# Altium PCB AI_Watch_PCB.PcbDoc (part 3 of 3)
Units mm, origin at the board's own origin, x right, y up, seen from the top; angles counter-clockwise.
Board outline 25 x 31 mm, 4 copper layers (Top Layer, Ground, Power, Bottom Layer), stack 1.586 mm thick; 87 components, 63 nets, 302 pads, 164 vias.
Unrouted connection lines stored in the file: 13.
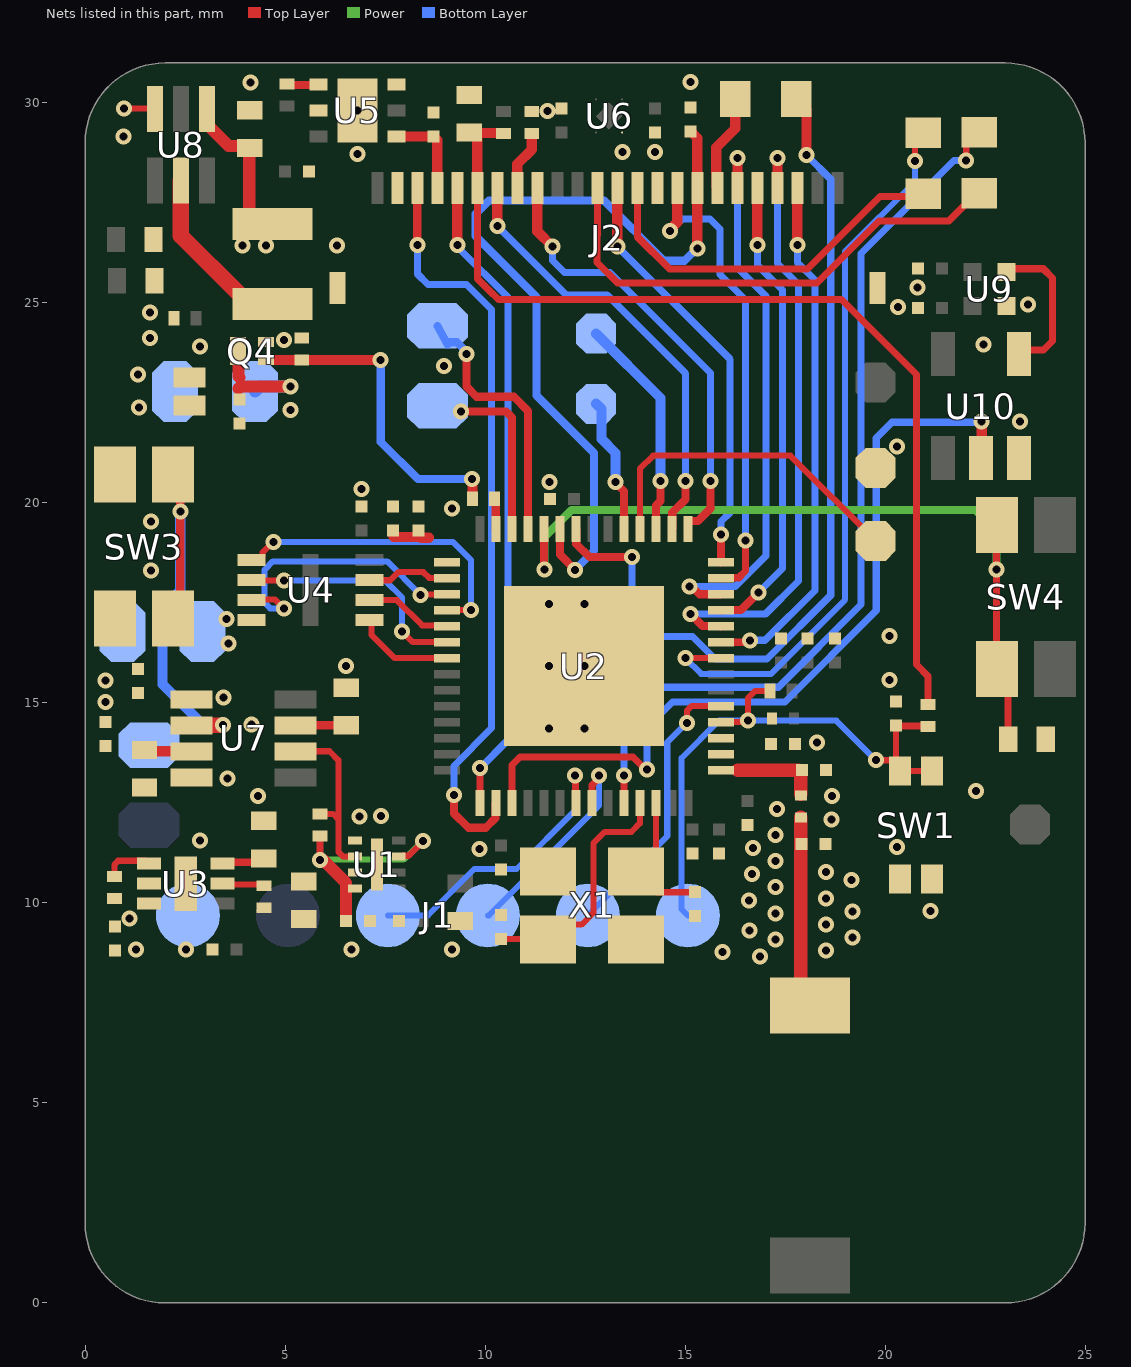
[diagram p4: the nets of this part, all layers, seen from the top]

## Via types
v1: diameter 0.4, hole 0.2, Top Layer to Bottom Layer, tented both sides, 146 vias
v2: diameter 0.4, hole 0.2, Top Layer to Bottom Layer, 18 vias

## Nets (pads, with @x,y where several pads share a name; then routed paths per layer and width w, separated by ;. In a path a pad name is that pad's centre, name@x,y a point inside that pad or via, vN(x,y) a via of type N, cw(c..) or ccw(c..) an arc to the next point about the centre after c; other vN are vias at no path point) (continued)
CSI_2V8: C32.2 J2.21 U5.1 | length 2.2
  Top Layer w0.254: U5.1@7.784,29.156 U5.1@7.784,29.156 8.711,29.158 C32.2@8.712,29.159 8.806,29.066 J2.21@8.806,27.879
CSI_D0: J2.6 U2.12 | length 14.1
  Top Layer w0.178: J2.6@16.306,27.879 J2.6@16.308,27.881 ; v1@16.308,28.623 v1(16.311,28.626)
  Top Layer w0.203: v1(15.111,17.91) 15.165,17.91 15.356,17.719 U2.12@15.896,17.719 U2.12@15.905,17.711
  Top Layer w0.254: J2.6@16.308,27.881 v1@16.308,28.623
  Bottom Layer w0.178: v1(15.111,17.91) 16.253,17.91 17.023,18.68 17.023,25.167 16.311,25.879 v1(16.311,28.626)
CSI_D1: J2.4 U2.10 | length 15.5
  Top Layer w0.178: v1@17.308,28.623 v1(17.311,28.626)
  Top Layer w0.203: v1(15.141,17.22) 15.439,16.922 15.894,16.922 U2.10@15.896,16.919
  Top Layer w0.254: J2.4@17.308,27.881 v1@17.308,28.623
  Bottom Layer w0.178: v1(15.141,17.22) 17.005,17.22 17.836,18.05 17.836,25.464 17.311,25.989 v1(17.311,28.626)
CSI_D2: J2.3 U2.9 | length 13.1
  Top Layer w0.178: U2.9@15.896,16.519 16.516,16.519 16.564,16.567 v1(16.624,16.567)
  Top Layer w0.254: v1(17.806,26.448) J2.3@17.806,27.879
  Bottom Layer w0.178: v1(16.624,16.567) 17.001,16.567 18.246,17.812 18.246,25.574 17.806,26.014 v1(17.806,26.448)
CSI_D3: J2.5 U2.11 | length 11.7
  Top Layer w0.203: U2.11@15.896,17.319 15.905,17.327 16.4,17.327 v1(16.837,17.764)
  Top Layer w0.254: v1(16.806,26.448) J2.5@16.806,27.879
  Bottom Layer w0.178: v1(16.806,26.448) 16.806,25.952 17.435,25.323 17.435,18.362 v1(16.837,17.764)
CSI_D4: J2.7 R15.1 | length 2.4
  Top Layer w0.254: J2.7@15.806,27.879 15.783,27.902 15.783,28.272 15.781,28.274 15.781,28.885 16.256,29.36 R15.1@16.256,30.098
CSI_D4#: R15.2 U2.22 | length 22.2
  Top Layer w0.203: U2.22@12.271,19.344 12.28,19.336 12.28,18.977 12.611,18.646 v1(13.671,18.646)
  Top Layer w0.254: R15.2@17.78,30.098 18.033,29.846 v1(18.033,28.702)
  Bottom Layer w0.178: v1(13.671,18.646) 13.671,17.16 14.174,16.657 15.189,16.657 15.746,16.101 17.05,16.101 18.641,17.692 18.641,28.093 v1(18.033,28.702)
CSI_D5: J2.9 U2.13 | length 12.1
  Top Layer w0.178: U2.13@15.896,18.119 15.909,18.131 16.341,18.131 16.511,18.302 v1(16.509,19.061) v1(16.509,19.061)
  Top Layer w0.254: v1(14.628,26.797) 14.628,26.837 14.806,27.014 J2.9@14.806,27.879
  Bottom Layer w0.178: v1(14.628,26.797) 14.933,27.102 15.622,27.102 15.876,26.847 15.876,25.709 16.509,25.076 v1(16.509,19.061)
CSI_D6: J2.11 R14.1 | length 9.6
  Top Layer w0.178: J2.11@13.806,27.879 13.806,26.656 14.615,25.847 18.058,25.847 19.873,27.661 R14.1@21.104,27.661
CSI_D6#: R14.2 U2.8 | length 18.4
  Top Layer w0.152: v1(15.008,16.119) U2.8@15.896,16.119 ; v1(20.747,28.554) 20.747,28.949 21.003,29.205 R14.2@21.055,29.205 ; R14.2@21.118,29.369 R14.2@21.18,29.431
  Bottom Layer w0.152: v1(15.008,16.119) 15.399,15.728 17.149,15.728 19.003,17.582 19.003,26.291 20.747,28.035 v1(20.747,28.554)
CSI_D7: J2.13 R16.2 | length 12.5
  Top Layer w0.178: J2.13@12.806,27.879 12.806,26.693 12.802,26.689 12.802,26.014 13.318,25.498 18.3,25.498 19.851,27.049 21.592,27.049 22.199,27.657 R16.2@22.199,27.745
CSI_D7#: R16.1 U2.52 | length 22.7
  Top Layer w0.152: v1(22.028,28.56) 22.028,28.965 22.119,29.055 R16.1@22.416,29.055 ; R16.1@22.199,29.269 22.212,29.283 R16.1@22.508,29.283
  Top Layer w0.178: U2.52@13.471,12.494 v1(13.471,13.183)
  Bottom Layer w0.178: v1(13.471,13.183) 13.471,14.563 14.302,15.393 17.333,15.393 19.398,17.458 19.398,26.237 21.721,28.56 v1(22.028,28.56)
CSI_HSYNC: J2.16 U2.15 | length 11.4
  Top Layer w0.203: U2.15@15.071,19.344 15.071,19.544 15.08,19.552 15.323,19.552 15.635,19.864 v1(15.635,20.551)
  Top Layer w0.254: J2.16@11.306,27.879 11.306,26.794 v1(11.687,26.413)
  Bottom Layer w0.178: v1(11.687,26.413) 11.687,26.058 11.982,25.763 13.125,25.763 15.637,23.25 15.637,20.553 v1(15.635,20.551)
CSI_MCLK: J2.12 U2.14 | length 10.6
  Top Layer w0.203: U2.14@15.896,18.519 v1(15.896,19.206)
  Top Layer w0.254: v1(13.306,26.413) J2.12@13.306,27.879
  Bottom Layer w0.178: v1(13.306,26.413) 16.127,23.591 16.127,19.766 15.896,19.536 v1(15.896,19.206)
CSI_PCLK: C34.1 J2.8 U2.23 | length 20.9
  Top Layer w0.203: U2.23@11.871,19.344 11.871,18.708 v1(12.25,18.329)
  Top Layer w0.254: C34.1@15.138,29.29 15.306,29.123 J2.8@15.306,27.879 v1(15.306,26.365)
  Bottom Layer w0.203: v1(12.25,18.329) 12.726,18.805 12.726,21.247 11.283,22.69 11.283,25.15 9.761,26.672 9.761,27.224 10.095,27.558 12.978,27.558 14.48,26.056 14.99,26.056 15.299,26.365 v1(15.306,26.365)
CSI_RST: C26.2 J2.19 R4.1 R8.2 | length 24.9
  Top Layer w0.178: C26.2@9.601,29.261 9.613,29.249 9.678,29.249 C26.2@9.806,29.121 ; J2.19@9.806,27.879 9.806,25.609 10.192,25.223 10.198,25.223 10.333,25.088 18.906,25.088 20.785,23.209 20.785,15.96 21.076,15.67 R8.2@21.076,14.961 ; R4.1@10.452,29.249 R4.1@10.464,29.237
  Top Layer w0.254: C26.2@9.678,29.249 R4.1@10.452,29.249 ; J2.19@9.806,27.879 C26.2@9.806,29.121
CSI_VSYNC: J2.18 U2.16 | length 11.2
  Top Layer w0.203: U2.16@14.671,19.344 14.68,19.352 14.68,19.763 15.008,20.091 v1(15.008,20.551)
  Top Layer w0.254: v1(10.306,26.921) J2.18@10.306,27.879
  Bottom Layer w0.178: v1(10.306,26.921) 12.029,25.197 13.052,25.197 15.008,23.241 v1(15.008,20.551)
DIN#: U9.4 U10.4 | length 3.8
  Top Layer w0.178: U9.4@23.031,25.855 23.953,25.855 24.187,25.621 24.187,24.049 23.963,23.825 U10.4@23.343,23.825
EN: C22.1 J1.6 R5.1 R8.1 SW1.2 SW1.4 U2.4 | length 14.9
  Top Layer w0.152: U2.4@15.896,14.519 16.533,14.519 v1(16.571,14.557) 16.571,15.121 16.751,15.3 R5.1@17.119,15.3 ; v1(19.769,13.569) 20.089,13.569 ; C22.1@20.282,14.424 20.269,14.411 20.269,13.405 SW1.2@20.377,13.297 SW1.4@21.177,13.297
  Top Layer w0.178: C22.1@20.282,14.424 R8.1@20.98,14.424 ; SW1.4@20.991,13.569 21.177,13.382 SW1.4@21.177,13.297
  Bottom Layer w0.152: J1.6@15.069,9.687 14.911,9.845 14.911,13.621 15.847,14.557 v1(16.571,14.557) 18.781,14.557 v1(19.769,13.569)
EN_3V3: R9.2 U1.6 U7.6 | length 4.5
  Top Layer w0.152: U7.6@5.264,13.793 6.11,13.793 6.334,13.569 6.334,12.104 6.334,11.278 6.454,11.158 U1.6@6.746,11.158 ; R9.2@5.796,12.224 6.198,12.224 6.318,12.104
ESP_USB_D+: TP2.1 U2.26 | length 4.1
  Top Layer w0.203: v1(9.395,22.289) 10.523,22.289 10.671,22.14 U2.26@10.671,19.344
ESP_USB_D-: TP2.2 U2.25 | length 6.8
  Top Layer w0.203: v1(9.538,23.728) 9.538,22.907 9.79,22.656 10.721,22.656 11.074,22.303 U2.25@11.074,19.344
  Bottom Layer w0.203: TP2.2@8.81,24.428 9.06,23.958 9.118,24.016 9.302,24.016 9.538,23.781 v1(9.538,23.728)
GATE_MOT: Q4.1 R6.2 R20.2 | length 8
  Top Layer w0.254: Q4.1@4.521,23.571 R20.2@5.416,23.571 v1(7.391,23.571) ; R6.2@9.682,20.206 v1@9.682,20.599
  Bottom Layer w0.203: v1(7.391,23.571) 7.391,21.527 8.319,20.599 v1(9.677,20.599)
GND: C1.1 C2.1 C3.1 C4.1 C5.1 C6.1 C7.1 C8.1 C9.1 C10.2 C11.1 C12.1 C13.1 C14.1 C15.1 C16.1 C17.1 C18.1 C19.1 C20.1 C21.1 C22.2 C23.1 C24.1 C25.2 C26.1 C27.1 C28.1 C29.1 C30.1 C31.1 C32.1 C33.1 C34.2 C35.2 C45.1 C46.2 C47.1 J1.1 J2.10 J2.23 J2.MP1 J2.MP2 Q4.2 R1.1 R3.2 R12.1 R19.2 R20.1 RT1.1 SW1.1 SW1.3 SW3.2 TP1.1 TP3.1 TP6.1 U1.5 U1.9 U2.57 U3.5 U3.7 U4.4 U5.3 U5.5 U5.7 U6.2 U7.4 U8.3 U9.3 U10.3 X1.2 X1.4 | length 0.9
  Top Layer w0.152: v1(0.974,29.861) 1.619,29.861 1.721,29.759 U8.3@1.721,29.671
  other v1: 15.934,8.779 1.27,8.839 2.518,8.839 6.655,8.839 9.169,8.839 21.133,9.804 9.855,11.353 20.295,11.405 2.87,11.557 18.661,12.091 6.858,12.167 7.398,12.169 4.318,12.675 18.669,12.675 22.276,12.802 3.556,13.106 18.299,14.014 11.594,14.362 12.483,14.362 20.113,15.57 6.528,15.926 11.594,15.921 12.483,15.921 3.581,16.485 20.113,16.671 3.541,17.098 11.594,17.48 12.483,17.48 1.651,18.313 1.651,19.533 9.169,19.863 6.909,20.345 11.608,20.527 20.293,21.412 23.375,22.042 8.97,23.426 2.873,23.909 22.455,23.967 4.973,24.076 1.626,24.13 1.626,24.765 20.32,24.905 23.57,24.965 20.814,25.389 6.299,26.441 6.809,28.727 13.437,28.778 14.249,28.778 0.965,29.159 6.809,29.806 11.557,29.794 4.14,30.505 15.138,30.522
  other v2: 16.875,8.663 18.522,8.809 17.26,9.085 19.182,9.136 16.616,9.312 18.522,9.463 17.26,9.739 19.182,9.79 16.6,10.066 18.522,10.117 17.26,10.393 19.16,10.57 16.676,10.72 18.522,10.771 17.26,11.047 16.702,11.374 17.26,11.701 17.302,12.354
GPIO0: J1.5 U2.5 | length 7
  Top Layer w0.152: v1@15.037,14.503 15.045,14.511 15.045,14.806 15.158,14.919 U2.5@15.896,14.919
  Bottom Layer w0.152: J1.5@12.569,9.687 14.554,11.672 14.554,14.012 v1(15.046,14.503)
HAPTIC_MOT: R6.1 U2.27 | length 0.8
  Top Layer w0.203: U2.27@10.268,19.344 R6.1@10.268,20.105
IMG_CAPTURE: R19.1 SW4.1 U2.24 | length 20.1
  Top Layer w0.152: v1@11.471,18.352 v1(11.481,18.342) ; v1@11.532,18.393 v1@11.582,18.342
  Top Layer w0.178: SW4.1@22.795,19.453 22.784,19.441 v1(22.784,18.339) 22.784,15.865 SW4.1@22.795,15.853 23.076,15.573 R19.1@23.076,14.097
  Top Layer w0.203: v1@11.471,18.352 U2.24@11.471,19.344
  Power w0.203: v1(11.481,18.342) 11.481,19.147 12.162,19.828 22.26,19.828 22.784,19.304 v1(22.784,18.339)
IO38/SCL: J2.20 U2.43 | length 16.1
  Top Layer w0.178: U2.43@9.871,12.494 v1(9.871,13.369)
  Top Layer w0.254: v1(9.306,26.452) J2.20@9.306,27.879
  Bottom Layer w0.178: v1@9.337,26.377 10.568,25.145 10.568,14.066 v1(9.871,13.369)
IO39/SDA: J2.22 U2.44 | length 19.1
  Top Layer w0.203: v1(8.306,26.452) J2.22@8.306,27.879 ; v1(9.22,12.7) 9.225,12.695 9.225,12.24 9.584,11.881 10.017,11.881 10.263,12.127 10.263,12.486 U2.44@10.271,12.494
  Bottom Layer w0.178: v1@8.241,26.452 v1(8.306,26.452) 8.306,25.73 8.574,25.462 9.537,25.462 10.164,24.835 10.164,14.371 9.22,13.427 v1(9.22,12.7)
LNA_IN: C19.2 L2.2 U2.1 | length 2.2
  Top Layer w0.33: 16.313,13.319 17.845,13.319 17.891,13.273 L2.2@17.891,12.713
NetANT1_1: ANT1.1 C18.2 L2.1 | length 4.9
  Top Layer w0.33: L2.1@17.891,12.15 17.891,7.836 ANT1.1@18.313,7.415
NetC28_2: C28.2 U7.3 | length 1.2
  Top Layer w0.254: C28.2@1.484,13.75 1.527,13.793 U7.3@2.664,13.793
NetC29_2: C29.2 U7.7 | length 1.3
  Top Layer w0.203: U7.7@5.264,14.443 C29.2@6.528,14.443
NetC48_1: C48.1 D1.1 Q4.3 TP5.1 | length 2.9
  Top Layer w0.305: Q4.3@3.827,23.803 3.839,23.791 3.839,23.16 3.857,23.142 ; 3.835,22.86 3.889,22.914 v1(5.131,22.914)
  Bottom Layer w0.305: TP5.1@4.247,22.785 4.377,22.914 v1@5.127,22.914
  other v1: 5.131,22.327
NetL4_2: L4.2 U8.5 | length 4.3
  Top Layer w0.406: U8.5@2.393,28.067 2.393,26.683 3.887,25.189 3.887,25.176 3.906,25.157 L4.2@4.684,25.157
NetR1_2: R1.2 U3.2 | length 1.1
  Top Layer w0.152: U3.2@3.435,10.482 3.453,10.464 4.434,10.464 R1.2@4.469,10.43
NetR13_1: R13.1 U5.4 | length 0.8
  Top Layer w0.203: R13.1@5.048,30.475 5.07,30.453 5.838,30.453 U5.4@5.86,30.431
NetRT1_2: RT1.2 U3.3 | length 1.1
  Top Layer w0.178: U3.3@3.435,10.982 3.471,11.018 4.376,11.018 RT1.2@4.47,11.112
NetTP9_1: TP9.1 U2.19 | length 3.4
  Top Layer w0.203: v1(13.261,20.523) 13.261,20.502 13.471,20.292 U2.19@13.471,19.344
  Bottom Layer w0.254: TP9.1@12.776,22.479 12.914,22.341 12.914,21.598 13.261,21.251 v1(13.261,20.523)
NetTP10_1: TP10.1 U2.18 | length 8.4
  Top Layer w0.152: U2.18@13.871,19.344 13.871,20.856 14.199,21.184 17.633,21.184 TP10.1@19.766,19.05
NetTP11_1: TP11.1 U2.17 | length 5.6
  Top Layer w0.203: U2.17@14.271,19.344 14.271,19.935 14.384,20.047 v1(14.384,20.551)
  Bottom Layer w0.254: TP11.1@12.776,24.232 14.384,22.624 v1(14.384,20.551)
P_BUTTON: SW3.1 U7.2 | length 10.9
  Top Layer w0.203: SW3.1@2.212,20.876 2.379,20.709 2.379,17.114 SW3.1@2.373,17.107
  Top Layer w0.381: U7.2@2.777,14.443 2.78,14.445 3.448,14.445 v1(3.451,14.448)
  Bottom Layer w0.254: v1@2.379,19.767 2.379,17.802 1.939,17.361 1.939,15.462 2.953,14.448 v1(3.451,14.448)
  other v1: 2.379,19.782
PWDN: J2.17 R3.1 | length 1.5
  Top Layer w0.254: J2.17@10.806,27.879 10.806,28.472 11.167,28.833 R3.1@11.167,29.237
RGB_LED: U2.45 U10.2 | length 20.2
  Top Layer w0.178: U2.45@10.671,12.764 10.671,13.452 10.869,13.649 13.701,13.649 14.013,13.337 v1(14.048,13.337)
  Top Layer w0.254: U10.2@22.415,21.248 v1(22.415,22.042)
  Top Layer w0.457: U10.2@22.393,21.225 U10.2@22.415,21.248
  Bottom Layer w0.178: v1(14.048,13.337) 14.048,14.388 14.685,15.025 17.494,15.025 19.778,17.309 19.778,21.625 20.172,22.019 22.392,22.019 v1(22.415,22.042)
RXD0: J1.4 U2.50 | length 5.4
  Top Layer w0.178: U2.50@12.671,12.495 12.676,12.499 12.676,12.947 12.835,13.107 v1@12.835,13.183
  Bottom Layer w0.152: J1.4@10.069,9.687 10.096,9.687 12.851,12.441 v1(12.851,13.183)
SPICLK: U2.33 U4.6 | length 2
  Top Layer w0.152: U4.6@7.363,17.569 7.796,17.569 8.426,16.939 8.82,16.939 9.026,16.939 U2.33@9.046,16.919
SPICSO: U2.32 U4.1 | length 7.8
  Top Layer w0.152: U4.1@4.166,18.595 4.366,18.595 4.439,18.668 4.439,18.764 v1(4.705,19.027) ; U2.32@9.046,17.319 v1(9.652,17.319)
  Bottom Layer w0.152: v1(4.705,19.027) 9.197,19.027 9.652,18.572 v1(9.652,17.319)
SPID: U2.35 U4.5 | length 2.5
  Top Layer w0.152: U4.5@7.163,17.069 7.163,16.697 7.741,16.119 U2.35@9.046,16.119
SPIHD: U2.30 U4.7 | length 2
  Top Layer w0.152: U4.7@7.163,18.069 7.629,18.069 7.834,18.273 8.457,18.273 8.602,18.128 9.037,18.128 U2.30@9.046,18.119
SPIQ: U2.34 U4.2 | length 6
  Top Layer w0.152: U4.2@4.216,18.069 4.221,18.064 4.974,18.064 v1(4.978,18.059) ; v1(7.925,16.789) 8.195,16.519 U2.34@9.046,16.519
  Bottom Layer w0.152: v1(4.978,18.059) 7.501,18.059 7.925,17.636 v1(7.925,16.789)
SPIWP: U2.31 U4.3 | length 7.2
  Top Layer w0.152: U4.3@4.242,17.594 4.308,17.528 4.368,17.587 4.744,17.587 v1(4.969,17.363) ; v1(8.382,17.704) 8.39,17.711 9.039,17.711 U2.31@9.046,17.719
  Bottom Layer w0.152: v1(4.969,17.363) 4.625,17.363 4.486,17.502 4.486,18.329 4.696,18.539 7.55,18.539 8.382,17.707 v1(8.382,17.704)
STAT: R2.2 U3.4 | length 1.2
  Top Layer w0.152: R2.2@0.737,10.664 0.737,10.966 0.826,11.055 1.527,11.055 U3.4@1.6,10.982
TXD0: J1.3 U2.49 | length 7.3
  Top Layer w0.178: v1(12.252,13.183) 12.262,13.173 12.262,12.504 U2.49@12.271,12.494
  Bottom Layer w0.152: J1.3@7.569,9.687 8.569,9.687 9.731,10.849 10.785,10.849 12.268,12.332 12.268,13.166 v1(12.252,13.183)
VBATT: C1.2 C2.2 C5.2 C7.2 C27.2 C47.2 C48.2 D1.2 L4.1 R2.1 R9.1 TP5.2 TP6.2 U1.3 U1.7 U1.8 U3.6 U7.1 U8.1 | length 9.5
  Top Layer w0.152: U1.3@7.921,11.166 7.937,11.181 8.089,11.181 v1(8.451,11.543)
  Top Layer w0.178: v1(5.871,11.077) R9.1@5.871,11.666
  Top Layer w0.305: U8.1@3.054,29.461 3.091,29.424 3.092,29.424 3.589,28.927 4.07,28.927 4.103,28.894 4.103,27.157 L4.1@4.684,27.157 ; v1@5.915,11.068 5.915,11.059 5.969,11.059 6.526,10.501 C1.2@6.526,9.549
  Power w0.152: v1@5.951,11.077 5.957,11.083 7.965,11.083 v1@8.451,11.569
  Bottom Layer w0.508: TP6.2@0.888,16.731 TP6.2@0.94,16.783
  other v1: 1.116,9.607 4.163,14.456 0.508,15.018 3.455,15.136 0.508,15.557 1.351,22.389 1.324,23.21 3.931,26.434 4.525,26.434
VDD3P3: C17.2 L1.2 U2.2 U2.3
VDD_SPI: C24.2 C25.1 U2.29 | length 0.9
  Top Layer w0.254: 7.708,19.147 8.375,19.147 ; 8.389,19.147 8.405,19.13 8.595,19.13
XTAL_N: C10.1 U2.53 X1.3 | length 6.2
  Top Layer w0.152: C10.1@10.401,9.103 X1.3@11.575,9.103 ; X1.3@11.752,9.116 X1.3@11.752,9.129 ; X1.3@11.765,9.103 X1.3@12.119,9.457 ; X1.3@11.966,9.457 X1.3@12.119,9.457 ; X1.3@12.144,9.482 X1.3@12.119,9.457 ; U2.53@13.871,12.494 13.871,11.987 13.66,11.776 12.997,11.776 12.709,11.488 12.709,9.752 12.414,9.457 X1.3@12.119,9.457
XTAL_P: C9.2 U2.54 X1.1 | length 3.6
  Top Layer w0.152: U2.54@14.271,12.494 14.271,11.288 X1.1@13.775,10.791 14.297,10.269 C9.2@15.242,10.269
pads on no net: ANT1.2 J2.1 J2.2 J2.24 U2.6 U2.7 U2.21 U2.28 U2.36 U2.37 U2.38 U2.39 U2.40 U2.41 U2.42 U2.48 U2.51 U4.9 U5.2 U6.5 U7.5 U7.8 U9.1 U10.1

## Polygon pours and split planes (outlines as drawn)
GND on Top Layer "GND_L01_P011" (solid, pour order 11): 2,0 cw(c2,2) 0,2 0,29 cw(c2,29) 2,31 23,31 cw(c23,29) 25,29 25,2 cw(c23,2) 23,0
GND on Top Layer "Top Layer-GND" (solid, pour order 17): 260 vertices, not listed, extent 14.566,5.925 19.803,15.024
VDD3P3 on Top Layer "VDD3P3_L01_P004" (solid, pour order 4): 17.197,14.766 17.323,14.765 17.323,14.64 17.323,13.609 15.547,13.609 15.547,14.249 16.731,14.249 16.993,14.511 16.993,14.765
3V3 on Top Layer "3V3_L01_P002" (solid, remove dead copper, pour order 2): 7.596,10.058 7.587,10.871 9.703,10.871 9.703,10.058
VBATT on Top Layer "VBATT_L01_P000" (solid, pour order 0): 5.107,10.22 6.929,10.221 6.924,10.846 6.48,10.851 6.019,11.274 5.104,11.271
GND on Ground "GND_L02_P012" (solid, pour order 12): 2,0 cw(c2,2) 0,2 0,29 cw(c2,29) 2,31 23,31 cw(c23,29) 25,29 25,2 cw(c23,2) 23,0
GND on Bottom Layer "GND_L04_P010" (solid, pour order 10): 2,0 cw(c2,2) 0,2 0,29 cw(c2,29) 2,31 23,31 cw(c23,29) 25,29 25,2 cw(c23,2) 23,0
VBATT on Power "NONET_L-01_P-001" (solid, pour order 14): 4.597,16.053 0.203,16.053 0.203,9.144 3.2,9.144 3.2,13.995 4.597,13.995 2.464,13.995 4.597,13.995
5V_BOOST on Power "NONET_L-01_P-001" (solid, pour order 18): 2.896,28.418 5.567,28.418 6.553,27.432 19.812,27.432 19.812,22.327 24.054,22.327 24.892,23.165 24.892,29.261 ccw(c23.261,29.261) 24.414,30.414 ccw(c23.458,29.459) 23.458,30.81 1.473,30.81 ccw(c1.473,29.624) 0.634,30.463 0.551,30.379 ccw(c1.39,29.54) 0.203,29.54 0.203,26.899 2.896,26.899
3V3 on Power "3V3_L03_P019" (solid, pour order 19): 2,0 cw(c2,2) 0,2 0,29 cw(c2,29) 2,31 23,31 cw(c23,29) 25,29 25,2 cw(c23,2) 23,0

## Other copper
Top Layer:
  rectangle net GND: 10.983,29.628 12.065,29.996
  rectangle net VDD3P3: 15.547,13.744 17.145,14.173
  rectangle net LNA_IN: 15.762,13.173 16.427,13.47
  rectangle net VDD_SPI: 8.721,18.48 9.373,19.329
  rectangle net VDD_SPI: 7.544,18.956 9.373,19.482
  rectangle net 3V3: 8.28,9.398 8.611,10.389
  rectangle net CHRG_PWR: 3.556,8.688 4.013,10.128
  rectangle net 3V3: 4.521,27.567 5.469,27.987
  rectangle net 5VBOOST_EN: 2.87,27.766 3.69,28.406
  rectangle net 5VBOOST_EN: 2.642,24.384 3.376,24.834
  region net 3V3: 13.689,30.444 13.321,30.444 13.321,29.991 13.689,29.991
  rectangle net 3V3: 12.514,29.991 12.881,30.444
  rectangle net 3V3: 4.75,28.811 6.045,29.388
  rectangle net 3V3: 4.699,27.567 5.232,30.048
  rectangle net NetC48_1: 4.309,22.099 5.34,23.01
  rectangle net NetC48_1: 3.607,22.377 5.34,23.01
  rectangle net VBATT: 0.914,21.768 4.064,22.226
  rectangle net NetC48_1: 3.607,22.377 4.064,24.155
  rectangle net NetC48_1: 2.21,22.835 4.064,23.393
  rectangle net VBATT: 0.914,21.768 3.353,22.682
  rectangle net VBATT: 0.914,21.768 1.753,23.495
  rectangle net VBATT: 3.937,14.249 4.369,15.4
  rectangle net VBATT: 0.139,14.9 4.369,15.4
  rectangle net VBATT: 0.139,14.368 1.803,15.4
  rectangle net VBATT: 0.139,14.368 1.029,15.897
  region net 5V_BOOST: 1.118,25.197 1.118,28.64 0.442,28.64 0.442,25.197
  rectangle net VBATT: 0.736,9.351 1.906,10.138
  rectangle net VBATT: 0.554,9.285 0.951,10.26
  rectangle net CHRG_PWR: 3.136,9.27 4.013,10.128
  rectangle net 3V3: 15.499,12.401 16.688,12.705
  rectangle net 3V3: 17.145,15.7 19.643,16.164
  rectangle net 3V3: 17.529,14.887 19.643,15.959
  rectangle net VBATT: 3.64,26.206 5.69,27.381
  region net 5V_BOOST: 1.78,27.497 1.78,28.64 0.697,28.64 0.697,27.497
  rectangle net 3V3: 14.622,12.147 15.123,12.815
  rectangle net 3V3: 14.649,11.707 16.016,12.882
  pour cut-out: 163 vertices and 0 holes, not listed, extent 15.639,6.997 18.73,13.951
Bottom Layer:
  rectangle net 3V3: 4.369,8.611 5.766,9.525
  rectangle net VBATT: 3.853,14.164 5.436,15.392
  rectangle net NetC48_1: 3.962,22.022 5.405,23.546
  rectangle net VBATT: 0.305,22.022 2.54,23.571
  rectangle net VBATT: 0.279,26.132 4.844,26.903
  rectangle net VBATT: 0.279,16.731 1.245,26.903
  rectangle net VBATT: 4.724,11.201 8.814,11.76
  rectangle net VBATT: 4.724,10.846 6.452,11.43
  rectangle net VBATT: 4.724,10.846 6.452,15.392
  rectangle net VBATT: 3.073,14.867 5.436,15.392
  rectangle net VBATT: 0.279,14.797 1.524,17.272
Multi-Layer:
  pour cut-out: 0,-0.203 24.994,-0.203 24.994,8.255 24.994,8.407 24.994,8.406 0.025,8.407

## Silkscreen, mask and mechanical layers (free items; w line width, h text height)
Top Overlay:
  text "5V" at 16.047,22.392 h1.5
  text "GND" at 16.047,20.258 h1.5
  text "3V3" at 24.243,8.252 h1.5 r90
Bottom Overlay:
  text "D-" at 8.084,25.336 h1.5 r270
  text "M-" at 3.412,24.02 h1.5 r270
  text "M+" at 1.652,24.012 h1.5 r270
  text "B+" at 0.269,17.923 h1.5 r270
  text "B-" at 2.072,17.923 h1.5 r270
  text "D+" at 8.059,17.818 h1.5 r270
  text "GND" at 6.464,13.164 h1.5
  text "5V" at 6.464,11.31 h1.5
Board Outline:
  the board outline again, w0.127
Fab:
  drawing of 295 lines, arcs and shapes, not listed
  text "Layer" at 62.547,34.341 h1.52
  text "Name" at 72.959,34.341 h1.52
  text "Material" at 96.575,34.341 h1.52
  text "Thickness" at 118.413,34.341 h1.52
  text "Constant" at 134.919,34.341 h1.52
  text "Board Layer Stack" at 149.393,34.341 h1.52
  text "Top Overlay" at 72.959,31.293 h1.52
  text "Top Solder" at 72.959,28.245 h1.52
  text "Solder Resist" at 96.575,28.245 h1.52
  text "0.010mm" at 118.413,28.245 h1.52
  text "3.8" at 134.919,28.245 h1.52
  text "1" at 62.547,25.197 h1.52
  text "Top Layer" at 72.959,25.197 h1.52
  text "0.035mm" at 118.413,25.197 h1.52
  text "Dielectric 2" at 72.959,22.149 h1.52
  text "PP-006" at 96.575,22.149 h1.52
  text "0.210mm" at 118.413,22.149 h1.52
  text "4.4" at 134.919,22.149 h1.52
  text "2" at 62.547,19.101 h1.52
  text "Ground" at 72.959,19.101 h1.52
  text "CF-004" at 96.575,19.101 h1.52
  text "0.015mm" at 118.413,19.101 h1.52
  text "Dielectric 1" at 72.959,16.053 h1.52
  text "FR-4" at 96.575,16.053 h1.52
  text "1.065mm" at 118.413,16.053 h1.52
  text "4.6" at 134.919,16.053 h1.52
  text "3" at 62.547,13.005 h1.52
  text "Power" at 72.959,13.005 h1.52
  text "CF-004" at 96.575,13.005 h1.52
  text "0.015mm" at 118.413,13.005 h1.52
  text "Dielectric 3" at 72.959,9.957 h1.52
  text "PP-006" at 96.575,9.957 h1.52
  text "0.210mm" at 118.413,9.957 h1.52
  text "4.4" at 134.919,9.957 h1.52
  text "4" at 62.547,6.909 h1.52
  text "Bottom Layer" at 72.959,6.909 h1.52
  text "0.035mm" at 118.413,6.909 h1.52
  text "Bottom Solder" at 72.959,3.861 h1.52
  text "Solder Resist" at 96.575,3.861 h1.52
  text "0.010mm" at 118.413,3.861 h1.52
  text "3.8" at 134.919,3.861 h1.52
  text "Bottom Overlay" at 72.959,0.813 h1.52
  text "Total board thickness:" at 62.547,-2.235 h1.52
  text "1.607mm" at 118.413,-2.235 h1.52
Drill Drawing:
  lines w0.254: 1.354,46.672 3.047,46.672 3.047,48.366 1.354,48.366 1.354,46.672
  lines w0.381: -0.165,45.529 176.368,45.529 ; -0.165,49.34 176.368,49.34 ; 13.827,41.719 13.827,53.149 ; 28.809,41.719 28.809,53.149 ; 55.218,41.719 55.218,53.149 ; 68.067,41.719 68.067,53.149 ; 86.705,41.719 86.705,53.149 ; 124.794,41.719 124.794,53.149 ; 139.776,41.719 139.776,53.149 ; 158.719,41.719 158.719,53.149 ; -0.165,41.719 176.368,41.719 176.368,53.149 -0.165,53.149 -0.165,41.719
  text "Symbol" at 2.121,50.482 h1.83
  text "Count" at 14.97,50.482 h1.83
  text "Hole Size" at 29.952,50.482 h1.83
  text "Plated" at 56.361,50.482 h1.83
  text "Hole Type" at 69.21,50.482 h1.83
  text "Drill Layer Pair" at 87.848,50.482 h1.83
  text "Via/Pad" at 125.937,50.482 h1.83
  text "Pad Shape" at 140.919,50.482 h1.83
  text "Template" at 159.862,50.482 h1.83
  text "164" at 14.97,46.672 h1.52
  text "0.200mm (7.87mil)" at 29.952,46.672 h1.52
  text "PTH" at 56.361,46.672 h1.52
  text "Round" at 69.21,46.672 h1.52
  text "Top Layer - Bottom Layer" at 87.848,46.672 h1.52
  text "Via" at 125.937,46.672 h1.52
  text "Rounded" at 140.919,46.672 h1.52
  text "(Mixed)" at 159.862,46.672 h1.52
  text "164 Total" at 14.97,42.862 h1.52

## Dimensions
23,31 to 23,0 on Top Overlay
0,29 to 25,29 on Top Overlay

## Text inside footprints (layer, text, board x,y; h text height)
J2: Top Overlay "1" at 18.72,26.502 h0.76; Mechanical 13 "PCB Edge" at 8.694,25.243 h0.8
SW3: Top Overlay "PCB EDGE" at 0.2,18.424 h0.3
SW4: Top Overlay "PCB EDGE" at 24.69,17.858 h0.3 r180